# Altium PCB Linux-Capable-Businnes-Card.PcbDoc (part 4 of 4)
Units mil, origin at the board's own origin, x right, y up, seen from the top; angles counter-clockwise.
Board outline 3385.83 x 2125.98 mil, 4 copper layers (L1 (TOP), L2 (GND), L3 (PWR), L4 (BOTTOM)), stack 38.228 mil thick; 154 components, 143 nets, 726 pads, 351 vias.
Unrouted connection lines stored in the file: 1.
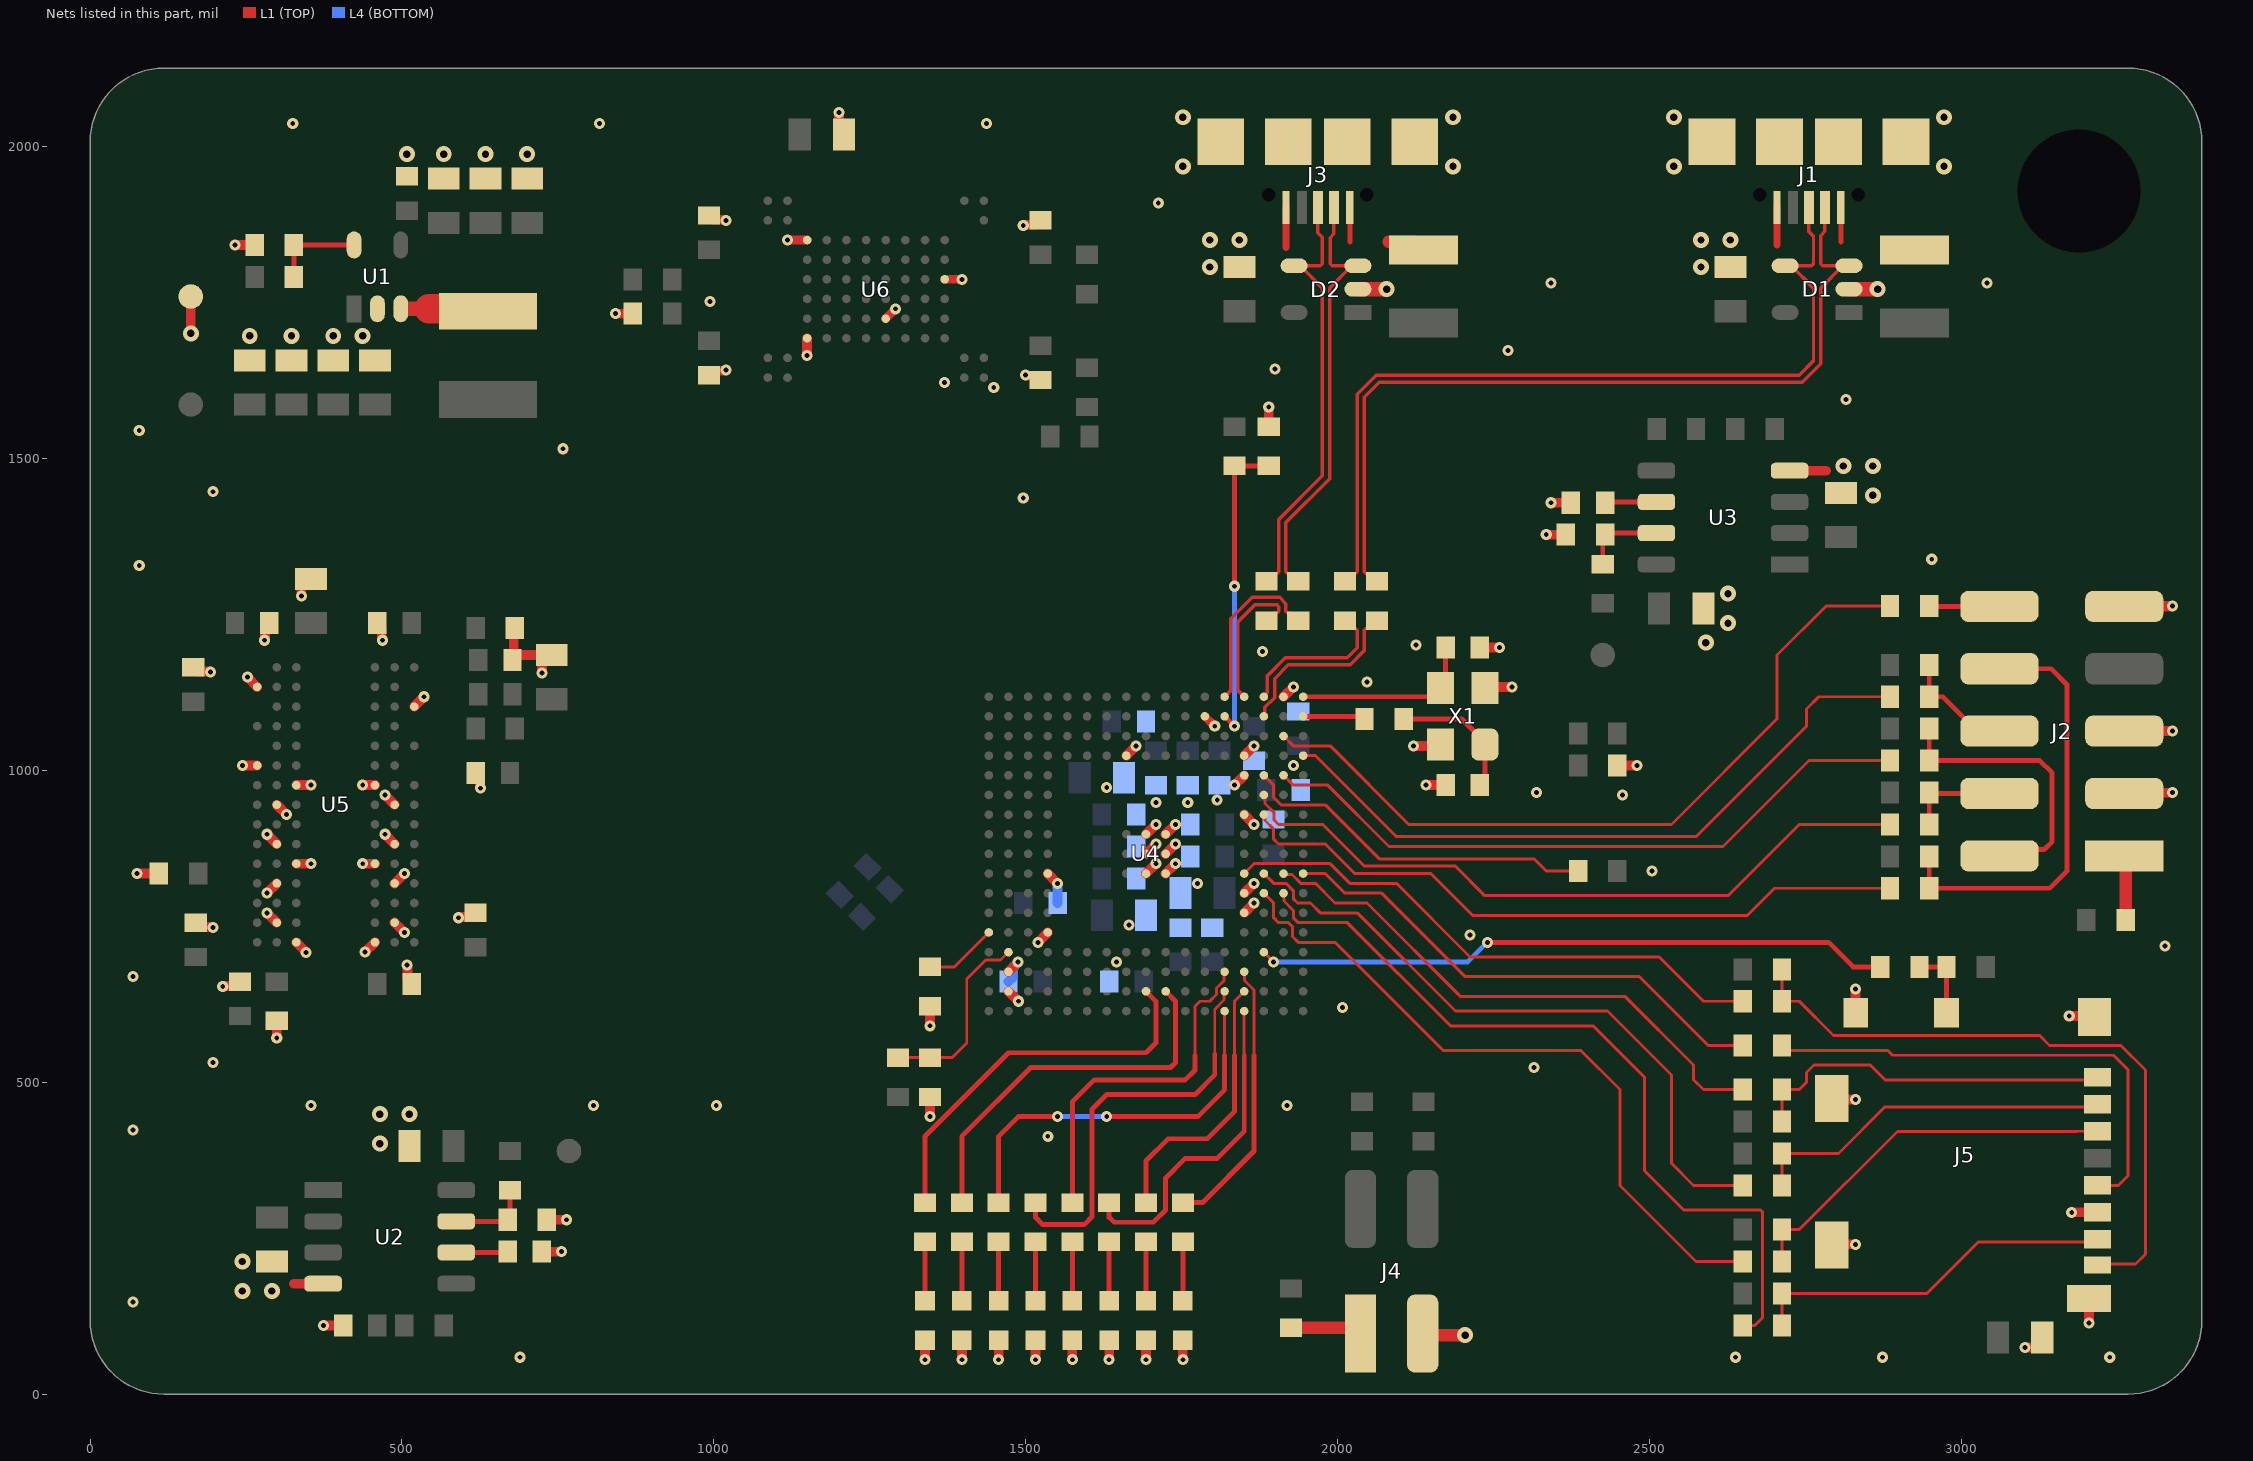
[diagram p6: the nets of this part, all layers, seen from the top]

## Via types
v1: diameter 17.72, hole 7.87, L1 (TOP) to L4 (BOTTOM), tented both sides, 280 vias
v2: diameter 25.59, hole 11.81, L1 (TOP) to L4 (BOTTOM), tented both sides, 71 vias

## Nets (pads, with @x,y where several pads share a name; then routed paths per layer and width w, separated by ;. In a path a pad name is that pad's centre, name@x,y a point inside that pad or via, vN(x,y) a via of type N, cw(c..) or ccw(c..) an arc to the next point about the centre after c; other vN are vias at no path point) (continued)
GND: C1.1 C2.1 C3.1 C4.1 C5.1 C6.1 C7.1 C8.1 C9.1 C10.1 C11.1 C12.1 C13.1 C14.1 C15.1 C16.1 C17.1 C18.1 C19.1 C20.1 C21.1 C22.1 C23.1 C24.1 C25.1 C26.1 C27.1 C28.1 C29.1 C30.1 C31.1 C32.1 C33.1 C34.1 C35.1 C36.1 C37.1 C38.1 C39.1 C40.1 C41.1 C42.1 C43.1 C44.1 C45.1 C46.1 C47.1 C49.1 C50.1 C51.1 C52.1 C53.1 C54.1 C55.1 C56.1 C57.1 C58.1 D1.2 D2.2 D3.1 D4.1 D5.1 D6.1 D7.1 D8.1 D9.1 D10.1 J1.5 J1.SH J2.3 J2.5 J2.9 J3.5 J3.SH J4.3 J5.6 J5.10 J5.MP R4.1 R5.1 R8.1 R11.1 R14.1 R15.1 R18.1 R19.1 R20.1 R24.1 R29.1 TP4.1 U1.2 U2.4 U3.4 U4.B2 U4.B3 U4.D5 U4.D8 U4.H14 U4.J8 U4.J9 U4.J10 U4.K8 U4.K9 U4.K10 U4.M16 U4.P6 U4.P7 U4.P11 U4.P13 U4.P14 U4.T17 U5.A3 U5.A7 U5.B2 U5.B8 U5.D2 U5.D8 U5.E3 U5.E7 U5.F2 U5.F8 U5.H2 U5.H8 U5.J3 U5.J7 U5.K9 U5.N1 U5.P9 U6.C5 U6.F7 U6.K3 U6.K8 X1.2 X1.4 | length 3386.9
  L1 (TOP) w11.81: 1917.32,1838.58 J3.5@1917.32,1902.56 ; 2704.72,1842.52 J1.5@2704.72,1902.56
  L1 (TOP) w13.78: v1(1118.11,1850.39) U6.K3@1149.61,1850.39 ; U6.F7@1275.59,1724.41 v1(1291.34,1740.16) ; U6.C5@1370.08,1787.4 v1(1397.64,1787.4) ; U4.M16@1787.4,1086.61 v1(1803.15,1070.87)
  L1 (TOP) w15.75: v1(74.8,834.65) R19.1@110.24,834.65 ; v2(161.42,1700.79) TP4.1@161.42,1759.84 ; C43.1@165.35,1165.35 172.24,1158.46 191.4,1158.46 192.38,1157.48 v1(192.91,1157.48) ; C40.1@169.29,755.91 176.18,749.02 195.33,749.02 196.32,748.03 v1(196.85,748.03) ; v1(212.6,653.54) 213.13,653.54 214.12,654.53 233.27,654.53 C47.1@240.16,661.42 ; v1(232.28,1842.52) R5.1@263.78,1842.52 ; v1(244.09,1007.87) U5.K9@267.72,1007.87 ; v1(251.97,1149.61) U5.P9@267.72,1133.86 ; v1(279.53,1208.66) 279.53,1209.19 280.51,1210.18 280.51,1229.33 C42.1@287.4,1236.22 ; v1(283.46,771.65) U5.B8@299.21,755.91 ; v1(283.46,803.15) U5.D8@299.21,818.9 ; v1(283.46,897.64) U5.F8@299.21,881.89 ; v1(299.21,570.87) R20.1@299.21,598.43 ; U5.H8@299.21,944.88 v1(314.96,929.13) ; 326.97,176.97 U2.4@373.54,176.97 ; U5.A7@330.71,724.41 330.71,723.87 345.92,708.66 v1(345.92,708.12) ; U5.E7@330.71,850.39 v1(354.33,850.39) ; U5.J7@330.71,976.38 v1(354.33,976.38) ; v1(338.58,1279.53) 338.58,1297.24 348.43,1307.09 C39.1@354.33,1307.09 ; v1(374.02,110.24) C10.1@405.51,110.24 ; v1(437.01,850.39) U5.E3@456.69,850.39 ; v1(437.01,976.38) U5.J3@456.69,976.38 ; v1(440.94,708.66) U5.A3@456.69,724.41 ; C41.1@460.63,1236.22 467.52,1229.33 467.52,1210.18 468.5,1209.19 v1(468.5,1208.66) ; v1(472.44,897.64) U5.F2@488.19,881.89 ; v1(472.44,960.63) U5.H2@488.19,944.88 ; U5.B2@488.19,755.91 v1(503.94,740.16) ; U5.D2@488.19,818.9 v1(503.94,834.65) ; v1(507.87,687.99) 507.87,687.46 508.86,686.48 508.86,664.37 C45.1@515.75,657.48 ; U5.N1@519.69,1102.36 v1(535.43,1118.11) ; v1(590.55,763.78) 591.08,763.78 592.07,764.76 611.22,764.76 C44.1@618.11,771.65 ; C46.1@618.11,996.06 625,989.17 625,972.97 625.98,971.99 v1(625.98,971.46) ; C50.1@677.17,1177.17 677.17,1178.15 C50.1@679.13,1180.12 ; R24.1@681.1,1228.35 679.13,1226.38 C50.1@679.13,1180.12 ; C12.1@724.41,228.35 v1(755.91,228.35) ; v1(724.41,1156.5) C49.1@724.41,1177.17 ; R4.1@732.28,279.53 v1(763.78,279.53) ; C49.1@740.16,1185.04 684.06,1185.04 C50.1@679.13,1180.12 ; v1(842.52,1732.28) R29.1@870.08,1732.28 ; C52.1@992.13,1633.86 999.02,1640.75 1018.17,1640.75 1019.15,1641.73 v1(1019.69,1641.73) ; C53.1@992.13,1889.76 999.02,1882.87 1018.17,1882.87 1019.15,1881.89 v1(1019.69,1881.89) ; v1(1149.61,1665.35) U6.K8@1149.61,1692.91 ; v1(1200.79,2055.12) 1200.79,2037.4 1198.82,2035.43 1208.66,2025.59 C51.1@1208.66,2019.69 ; v1(1338.57,55.12) D3.1@1338.57,86.61 ; v1(1346.46,444.88) R11.1@1346.46,476.38 ; v1(1346.46,590.55) R15.1@1346.46,622.05 ; v1(1397.64,55.12) D4.1@1397.64,86.61 ; v1(1456.69,55.12) D5.1@1456.69,86.61 ; U4.B2@1472.44,645.67 v1(1488.19,629.92) ; U4.B3@1472.44,677.17 1487.72,692.44 v1(1487.72,692.56) ; v1(1496.06,1874.02) 1496.6,1874.02 1497.58,1875 1516.73,1875 C54.1@1523.62,1881.89 ; v1(1499.41,1633.86) 1499.94,1633.86 1500.93,1632.87 1516.73,1632.87 C55.1@1523.62,1625.98 ; v1(1515.75,55.12) D6.1@1515.75,86.61 ; v1(1519.68,724.41) U4.D5@1535.43,740.16 ; U4.D8@1535.43,834.65 v1(1551.18,818.9) ; v1(1574.8,55.12) D7.1@1574.8,86.61 ; v1(1633.86,55.12) D8.1@1633.86,86.61 ; U4.H14@1661.42,1023.62 v1(1677.17,1039.37) ; v1(1692.91,55.12) D9.1@1692.91,86.61 ; U4.J8@1692.91,834.65 v1(1708.66,850.39) ; U4.J9@1692.91,866.14 v1(1708.66,881.89) ; U4.J10@1692.91,897.64 v1(1708.66,913.39) ; U4.K8@1724.41,834.65 v1(1740.16,850.39) ; U4.K9@1724.41,866.14 v1(1740.16,881.89) ; U4.K10@1724.41,897.64 v1(1740.16,913.39) ; v1(1751.97,55.12) D10.1@1751.97,86.61 ; v1(1834.65,976.38) U4.P13@1850.39,992.13 ; U4.P6@1850.39,771.65 v1(1866.14,787.4) ; U4.P7@1850.39,803.15 v1(1866.14,818.9) ; U4.P11@1850.39,929.13 v1(1866.14,913.39) ; U4.P14@1850.39,1023.62 v1(1866.14,1039.37) ; R18.1@1889.76,1551.18 v1(1889.76,1582.68) ; U4.T17@1913.39,1118.11 v1(1929.13,1133.86) ; v1(2122.05,1039.37) 2163.39,1039.37 X1.4@2165.35,1041.34 ; v1(2141.73,976.38) C37.1@2173.23,976.38 ; C38.1@2228.35,1196.85 v1(2259.84,1196.85) ; X1.2@2236.22,1131.89 2238.19,1133.86 v1(2279.53,1133.86) ; v1(2334.65,1377.95) R8.1@2366.14,1377.95 ; v1(2342.52,1429.13) C15.1@2374.02,1429.13 ; R14.1@2448.82,1007.87 v1(2480.31,1007.87) ; U3.4@2724.88,1480.51 2783.46,1480.51 ; J5.MP@2792.32,238.98 2793.5,240.16 v1(2830.71,240.16) ; J5.MP@2792.32,474.02 2793.9,472.44 v1(2830.71,472.44) ; J5.10@2830.71,611.81 v1(2830.71,649.61) ; v1(3102.36,74.8) 3120.08,74.8 3129.92,84.65 C58.1@3129.92,90.55 ; v1(3173.23,606.3) 3212.2,606.3 J5.MP@3213.58,604.92 ; v1(3177.17,291.34) 3177.26,291.44 3218.41,291.44 J5.6@3218.5,291.54 ; v1(3204.72,114.17) J5.MP@3204.72,159.25 ; J2.3@3261.42,962.99 3262.62,964.19 3338.21,964.19 v1(3338.58,964.57) ; J2.5@3261.42,1062.99 v1(3338.58,1062.99) ; v1(3338.58,1263.78) v1@3338.21,1263.4 ; v1@3338.21,1263.4 3337.8,1262.99 J2.9@3261.42,1262.99 3261.83,1263.4 v1@3338.21,1263.4
  L1 (TOP) w19.68: J4.3@2133.86,94.49 v2(2204.72,94.49)
  L1 (TOP) w23.62: D2.2@2032.68,1771.65 v2(2078.74,1771.65) ; D1.2@2820.08,1771.65 v2(2866.14,1771.65)
  L4 (BOTTOM) w15.75: C34.1@1472.44,661.42 1479.33,668.31 1479.33,683.64 1487.72,692.03 v1(1487.72,692.56) ; C17.1@1551.18,787.4 v1(1551.18,818.9)
  other v1: 688.98,59.06 2637.8,59.06 2874.02,59.06 3238.19,59.06 68.9,147.64 1535.43,413.39 68.9,423.23 354.33,462.6 807.09,462.6 1003.94,462.6 1919.29,462.6 2314.96,523.62 196.85,531.5 2007.87,620.08 68.9,669.29 1645.67,692.91 3326.77,718.5 2212.6,736.22 1665.35,751.97 1775.59,818.9 2503.94,838.58 1708.66,948.82 1759.84,948.82 1807.09,952.76 2456.69,960.63 2318.9,964.57 1629.92,972.44 1929.13,1007.87 2047.24,1141.73 1879.92,1190.94 2125.98,1200.79 78.74,1328.74 2952.76,1338.58 1496.06,1437.01 196.85,1446.85 757.87,1515.75 78.74,1545.28 2814.96,1594.49 1448.82,1614.17 1370.08,1622.05 1899.61,1643.7 2273.62,1673.23 994.09,1751.97 2342.52,1781.5 3041.34,1781.5 1712.6,1909.45 324.8,2037.4 816.93,2037.4 1437.01,2037.4
  other v2: 244.09,165.35 291.34,165.35 244.09,212.6 464.57,401.57 464.57,448.82 511.81,448.82 2590.55,1204.72 2625.98,1236.22 2625.98,1283.46 2858.27,1440.94 2811.02,1488.19 2858.27,1488.19 255.91,1696.85 322.83,1696.85 389.76,1696.85 437.01,1696.85 1795.28,1807.09 2582.68,1807.09 1795.28,1850.39 1842.52,1850.39 2582.68,1850.39 2629.92,1850.39 1751.97,1968.5 2185.04,1968.5 2539.37,1968.5 2972.44,1968.5 507.87,1988.19 566.93,1988.19 633.86,1988.19 700.79,1988.19 1751.97,2047.24 2185.04,2047.24 2539.37,2047.24 2972.44,2047.24
JTAG_J_RSTn: J2.10 R41.1 | length 112.9
  L1 (TOP) w4.72: R41.1@2948.82,1263.78 R41.1@2949.6,1262.99
  L1 (TOP) w7.87: R41.1@2949.6,1262.99 J2.10@3061.42,1262.99
JTAG_J_TCK: J2.4 R33.1 R38.1 | length 164.4
  L1 (TOP) w7.87: R38.1@2948.82,913.39 R33.1@2948.82,964.57 2950.39,962.99 J2.4@3061.42,962.99
JTAG_J_TDI: J2.8 R35.1 R40.1 | length 700.6
  L1 (TOP) w7.87: R35.1@2948.82,862.2 R40.1@2948.82,811.02 3141.73,811.02 3169.29,838.58 3169.29,1137.8 3144.09,1162.99 J2.8@3061.42,1162.99
JTAG_J_TDO: J2.6 R34.1 R39.1 | length 186.6
  L1 (TOP) w7.87: R34.1@2948.82,1169.29 R39.1@2948.82,1118.11 2970.67,1118.11 3025.78,1062.99 J2.6@3061.42,1062.99
JTAG_J_TMS: J2.2 R32.1 R37.1 | length 460.1
  L1 (TOP) w7.87: R32.1@2948.82,1066.93 R37.1@2948.82,1015.75 3125.98,1015.75 3145.67,996.06 3145.67,885.83 3132.98,873.13 3071.56,873.13 J2.2@3061.42,862.99
JTAG_TCK: R38.2 U4.R12 | length 1131.9
  L1 (TOP) w4.72: U4.R12@1881.89,960.63 1883.62,958.9 1883.62,947 1898.43,932.19 1898.43,920.47 1905.51,913.39 1976.38,913.39 2043.31,846.46 2188.98,846.46 2236.22,799.21 2625.98,799.21 2740.16,913.39 R38.2@2885.83,913.39
JTAG_TDI: R40.2 U4.R11 | length 1102.6
  L1 (TOP) w4.72: U4.R11@1881.89,929.13 1883.62,927.4 1883.62,919.53 1897.64,905.51 1897.64,889.76 1905.51,881.89 1980.31,881.89 2027.56,834.65 2149.61,834.65 2216.54,767.72 2657.48,767.72 2700.79,811.02 R40.2@2885.83,811.02
JTAG_TDO: R39.2 U4.U14 | length 1103.9
  L1 (TOP) w4.72: U4.U14@1944.88,1023.62 1964.57,1023.62 2094.49,893.7 2574.8,893.7 2751.97,1070.87 2751.97,1098.43 2771.65,1118.11 R39.2@2885.83,1118.11
JTAG_TMS: R37.2 U4.T13 | length 1076.8
  L1 (TOP) w4.72: U4.T13@1913.39,992.13 1929.13,976.38 1984.25,976.38 2082.68,877.95 2618.11,877.95 2755.91,1015.75 R37.2@2885.83,1015.75
JTAGSEL: R10.1 R11.2 U4.B4 | length 307.2
  L1 (TOP) w4.72: R10.1@1295.28,539.37 1381.89,539.37 1405.51,562.99 1405.51,665.35 1436.02,695.87 1459.65,695.87 U4.B4@1472.44,708.66
LED_0: R60.2 U4.J2 | length 627.5
  L1 (TOP) w7.87: R60.2@1338.58,307.09 1338.58,413.38 1472.44,547.24 1692.91,547.24 1708.66,562.99 1708.66,629.92 U4.J2@1692.91,645.67
LED_1: R61.2 U4.K2 | length 618.4
  L1 (TOP) w7.87: R61.2@1397.64,307.09 1397.64,413.39 1507.87,523.62 1732.28,523.62 1740.16,531.5 1740.16,629.92 U4.K2@1724.41,645.67
LED_2: R62.2 U4.N1 | length 625.5
  L1 (TOP) w4.72: 1818.9,543.31 U4.N1@1818.9,614.17
  L1 (TOP) w7.87: R62.2@1456.69,307.09 1456.69,413.39 1488.19,444.88 v1(1551.18,444.88) ; v1(1629.92,444.88) 1775.59,444.88 1818.9,488.19 1818.9,543.31
  L4 (BOTTOM) w7.87: v1(1551.18,444.88) v1(1629.92,444.88)
LED_3: R63.2 U4.N2 | length 656.9
  L1 (TOP) w4.72: 1803.15,545.28 1803.15,616.7 1818.15,631.69 1818.15,644.92 U4.N2@1818.9,645.67
  L1 (TOP) w7.87: R63.2@1515.75,307.09 1515.75,283.46 1527.56,271.65 1593.81,271.65 1606.3,284.14 1606.3,456.69 1629.92,480.32 1771.65,480.32 1803.15,511.81 1803.15,545.28
LED_4: R64.2 U4.N3 | length 565.7
  L1 (TOP) w4.72: 1771.65,543.31 1771.65,622.05 1779.53,629.92 1795.28,629.92 1806.1,640.75 1806.1,650.97 1818.32,663.19 1818.32,676.59 U4.N3@1818.9,677.17
  L1 (TOP) w7.87: R64.2@1574.8,307.09 1574.8,468.5 1610.24,503.94 1755.91,503.94 1771.65,519.69 1771.65,543.31
LED_5: R65.2 U4.P1 | length 526.7
  L1 (TOP) w4.72: 1850.39,543.31 U4.P1@1850.39,614.17
  L1 (TOP) w7.87: R65.2@1633.86,307.09 1633.86,283.46 1641.73,275.59 1704.72,275.59 1724.41,295.28 1724.41,346.46 1755.91,377.95 1807.09,377.95 1850.39,421.26 1850.39,543.31
LED_6: R66.2 U4.P2 | length 440.7
  L1 (TOP) w4.72: 1834.65,543.31 1834.65,629.92 U4.P2@1850.39,645.67
  L1 (TOP) w7.87: R66.2@1692.91,307.09 1692.91,374.02 1728.35,409.45 1791.34,409.45 1834.65,452.76 1834.65,543.31
LED_7: R67.2 U4.P3 | length 442.3
  L1 (TOP) w4.72: U4.P3@1850.39,677.17 1850.97,676.59 1850.97,663.19 1866.14,648.02 1866.14,543.31
  L1 (TOP) w7.87: R67.2@1751.97,307.09 1783.46,307.09 1866.14,389.76 1866.14,543.31
NetC12_2: C12.2 U2.6 | length 82.8
  L1 (TOP) w7.87: U2.6@587.09,226.97 667.91,226.97 C12.2@669.29,228.35
NetC15_2: C15.2 U3.6 | length 82.8
  L1 (TOP) w7.87: C15.2@2429.13,1429.13 2430.51,1430.51 U3.6@2511.34,1430.51
NetC37_2: C37.2 R16.1 X1.1 | length 217.6
  L1 (TOP) w7.87: R16.1@2106.3,1082.68 2198.82,1082.68 2236.22,1045.28 X1.1@2236.22,1041.34 2236.22,984.25 C37.2@2228.35,976.38
NetD3_2: D3.2 R60.1 | length 94.5
  L1 (TOP) w7.87: D3.2@1338.57,149.61 R60.1@1338.58,244.09
NetD4_2: D4.2 R61.1 | length 94.5
  L1 (TOP) w7.87: D4.2@1397.64,149.61 R61.1@1397.64,244.09
NetD5_2: D5.2 R62.1 | length 94.5
  L1 (TOP) w7.87: D5.2@1456.69,149.61 R62.1@1456.69,244.09
NetD6_2: D6.2 R63.1 | length 94.5
  L1 (TOP) w7.87: D6.2@1515.75,149.61 R63.1@1515.75,244.09
NetD7_2: D7.2 R64.1 | length 94.5
  L1 (TOP) w7.87: D7.2@1574.8,149.61 R64.1@1574.8,244.09
NetD8_2: D8.2 R65.1 | length 94.5
  L1 (TOP) w7.87: D8.2@1633.86,149.61 R65.1@1633.86,244.09
NetD9_2: D9.2 R66.1 | length 94.5
  L1 (TOP) w7.87: D9.2@1692.91,149.61 R66.1@1692.91,244.09
NetD10_2: D10.2 R67.1 | length 94.5
  L1 (TOP) w7.87: D10.2@1751.97,149.61 R67.1@1751.97,244.09
NetF1_1: F1.1 J1.1 | length 55.1
  L1 (TOP) w7.87: 2807.09,1847.44 J1.1@2807.09,1902.56
NetF2_1: F2.1 J3.1 | length 116.7
  L1 (TOP) w7.87: 2019.69,1847.49 J3.1@2019.69,1902.56
  L1 (TOP) w19.68: 2081.69,1847.44 2124.41,1847.44 F2.1@2137.8,1834.06
NetJ2_1: J2.1 R31.1 | length 108.1
  L1 (TOP) w19.68: J2.1@3261.42,862.99 3263.78,860.64 R31.1@3263.78,759.84 R31.1@3263.78,755.91
NetJ4_1: J4.1 R44.1 | length 115.3
  L1 (TOP) w19.68: R44.1@1925.2,106.3 2027.17,106.3 J4.1@2036.61,96.85
NetL1_1: L1.1 U1.3 | length 135.8
  L1 (TOP) w23.62: U1.3@498.03,1740.16 543.31,1740.16
  L1 (TOP) w47.24: 543.31,1740.16 L1.1@633.86,1740.16
NetR1_1: R1.1 R4.2 U2.7 | length 132.1
  L1 (TOP) w7.87: U2.7@587.09,276.97 666.73,276.97 R4.2@669.29,279.53 673.23,283.46 R1.1@673.23,326.77
NetR3_2: R3.2 R5.2 U1.5 | length 147.6
  L1 (TOP) w7.87: R3.2@326.77,1791.34 R5.2@326.77,1842.52 U1.5@423.23,1842.52
NetR6_1: R6.1 R8.2 U3.7 | length 132.1
  L1 (TOP) w7.87: R6.1@2425.2,1330.71 2425.2,1374.02 2431.69,1380.51 U3.7@2511.34,1380.51
NRST: R12.2 U4.R13 | length 579.1
  L1 (TOP) w4.72: U4.R13@1881.89,992.13 1897.64,976.38 1897.64,956.69 1909.45,944.88 1980.32,944.88 2066.93,858.27 2314.96,858.27 2334.65,838.58 R12.2@2385.83,838.58
NTRST: R41.2 U4.T15 | length 1236.2
  L1 (TOP) w4.72: U4.T15@1913.39,1055.12 1929.13,1039.37 1988.19,1039.37 2114.17,913.39 2535.43,913.39 2704.72,1082.68 2704.72,1185.04 2783.46,1263.78 R41.2@2885.83,1263.78
SD_CD: R59.2 U4.R4 | length 1024.1
  L1 (TOP) w4.72: U4.R4@1881.89,708.66 v1(1897.64,692.91)
  L1 (TOP) w7.87: v1(2240.16,724.41) 2787.4,724.41 2826.77,685.04 R59.2@2870.08,685.04
  L4 (BOTTOM) w7.87: v1(1897.64,692.91) 2208.66,692.91 v1(2240.16,724.41)
SD_CLK: R56.2 U4.U8 | length 818.9
  L1 (TOP) w4.72: U4.U8@1944.88,834.65 1980.32,834.65 2011.81,803.15 2070.98,803.15 2204.84,669.29 2484.25,669.29 2594.49,559.06 R56.2@2649.61,559.06
SD_CMD: R55.2 U4.R7 | length 1125.3
  L1 (TOP) w4.72: U4.R7@1881.89,803.15 1897.64,787.4 1897.64,763.78 1905.51,755.91 1921.26,755.91 1927.85,749.32 1927.85,733.57 1937.01,724.41 1996.06,724.41 2169.29,551.18 2389.76,551.18 2452.76,488.19 2452.76,334.65 2574.8,212.6 R55.2@2649.61,212.6
SD_DAT0: R57.2 U4.T7 | length 1287.6
  L1 (TOP) w4.72: U4.T7@1913.39,803.15 1913.96,802.57 1913.96,790.76 1929.13,775.59 1929.13,763.78 1937.01,755.91 2015.75,755.91 2181.1,590.55 2409.45,590.55 2492.13,507.87 2492.13,358.27 2555.12,295.28 2678.33,295.28 2681.1,292.51 2681.1,122.05 2669.29,110.24 R57.2@2649.6,110.24
SD_DAT1: R58.2 U4.P8 | length 897.1
  L1 (TOP) w4.72: U4.P8@1850.39,834.65 1866.14,850.39 1988.19,850.39 2019.69,818.9 2094.49,818.9 2212.6,700.79 2515.75,700.79 2586.61,629.92 R58.2@2649.61,629.92
SD_DAT2: R53.2 U4.T8 | length 893.6
  L1 (TOP) w4.72: U4.T8@1913.39,834.65 1915.12,832.91 1927.02,832.91 1941.03,818.9 1964.57,818.9 1996.06,787.4 2047.24,787.4 2196.85,637.8 2460.63,637.8 2570.87,527.56 2570.87,503.94 2586.61,488.19 R53.2@2649.61,488.19
SD_DAT3: R54.2 U4.R8 | length 1065.4
  L1 (TOP) w4.72: U4.R8@1881.89,834.65 1897.64,818.9 1917.32,818.9 1929.13,807.09 1929.13,794.11 1935.84,787.4 1956.69,787.4 1972.44,771.65 2031.5,771.65 2188.98,614.17 2433.07,614.17 2535.43,511.81 2535.43,370.08 2570.86,334.65 R54.2@2649.6,334.65
SD_R_CD: J5.9 R52.1 R59.1 | length 116.5
  L1 (TOP) w7.87: R59.1@2933.07,685.04 R52.1@2976.38,685.04 J5.9@2976.38,611.81
SD_R_CLK: J5.5 R56.1 | length 796.5
  L1 (TOP) w4.72: R56.1@2712.6,559.06 2720.47,551.18 2881.89,551.18 2889.76,543.31 3244.09,543.31 3267.72,519.69 3267.72,350.39 3251.97,334.65 3218.7,334.65 J5.5@3218.5,334.84
SD_R_CMD: J5.3 R49.1 R55.1 | length 622.4
  L1 (TOP) w4.72: R55.1@2712.6,212.6 R49.1@2712.6,263.78 2740.16,263.78 2897.64,421.26 3185.04,421.26 3185.24,421.46 J5.3@3218.5,421.46
SD_R_DAT0: J5.7 R50.1 R57.1 | length 593
  L1 (TOP) w4.72: R57.1@2712.6,110.24 R50.1@2712.6,161.42 2944.88,161.42 3027.56,244.09 3214.37,244.09 J5.7@3218.5,248.23
SD_R_DAT1: J5.8 R51.1 R58.1 | length 1058.8
  L1 (TOP) w4.72: R51.1@2712.6,681.1 R58.1@2712.6,629.92 2740.16,629.92 2795.28,574.8 3125.98,574.8 3141.73,559.06 3255.91,559.06 3295.28,519.69 3295.28,224.41 3279.53,208.66 3220.28,208.66 J5.8@3218.5,206.89
SD_R_DAT2: J5.1 R47.1 R53.1 | length 594.1
  L1 (TOP) w4.72: R47.1@2712.6,437.01 R53.1@2712.6,488.19 2740.16,488.19 2751.97,500 2751.97,515.75 2763.78,527.56 2854.33,527.56 2877.95,503.94 3214.37,503.94 J5.1@3218.5,508.07
SD_R_DAT3: J5.2 R48.1 R54.1 | length 589.8
  L1 (TOP) w4.72: R54.1@2712.6,334.65 R48.1@2712.6,385.83 2803.15,385.83 2877.95,460.63 3214.37,460.63 J5.2@3218.5,464.76
USB_D_N: D1.3 J1.2 R30.1 | length 1361.7
  L1 (TOP) w5.55: R30.1@2062.99,1303.15 2051,1315.14 2046.42,1315.14 2043.17,1318.39 2043.17,1598.29 2066.93,1622.05 2744.94,1622.05 2774.67,1651.78 2774.67,1773.48 2810.24,1809.06 2777.92,1809.06 2774.67,1812.31 2774.67,1857.34 2781.5,1864.17 J1.2@2781.5,1902.56
USB_D_P: D1.4 J1.3 R36.1 | length 1371.7
  L1 (TOP) w5.55: R36.1@2011.81,1303.15 2023.8,1315.14 2028.38,1315.14 2031.63,1318.39 2031.63,1603.07 2062.15,1633.58 2740.16,1633.58 2763.13,1656.56 2763.13,1773.48 D1.4@2727.56,1809.06 ; D1.4@2717.72,1809.06 D1.4@2727.56,1809.06 ; J1.3@2755.91,1902.56 2755.91,1863.92 2763.13,1856.7 2763.13,1812.31 2759.88,1809.06 D1.4@2727.56,1809.06
USB_H_N: D2.3 J3.2 R42.1 | length 694
  L1 (TOP) w5.55: R42.1@1937.01,1303.15 1925.02,1315.14 1920.44,1315.14 1917.18,1318.39 1917.18,1397.5 1987.26,1467.58 1987.26,1773.48 2022.83,1809.06 D2.3@2032.68,1809.06 ; J3.2@1994.09,1902.56 1994.09,1860.24 1988.19,1854.33 1988.19,1812.31 1991.44,1809.06 D2.3@2017.72,1809.06
USB_H_P: D2.4 J3.3 R43.1 | length 700.6
  L1 (TOP) w5.55: R43.1@1885.83,1303.15 1897.81,1315.14 1902.4,1315.14 1905.65,1318.39 1905.65,1402.28 1975.73,1472.36 1975.73,1773.48 D2.4@1940.16,1809.06 ; D2.4@1930.32,1809.06 D2.4@1940.16,1809.06 ; J3.3@1968.5,1902.56 1968.5,1862.2 1975.73,1854.98 1975.73,1812.31 1972.48,1809.06 D2.4@1940.16,1809.06
USBD_N: R30.2 U4.R16 | length 289.2
  L1 (TOP) w5.55: U4.R16@1881.89,1086.61 1883.46,1088.19 1883.46,1101 1899.19,1116.73 1899.19,1147.22 1921.26,1169.29 2020.25,1169.29 2043.17,1192.21 2043.17,1224.92 2046.42,1228.17 2051,1228.17 R30.2@2062.99,1240.16
USBD_P: R36.2 U4.R17 | length 253
  L1 (TOP) w5.55: U4.R17@1881.89,1118.11 1881.89,1119.71 1887.66,1125.48 1887.66,1152 1916.48,1180.83 2015.47,1180.83 2031.63,1196.99 2031.63,1224.92 2028.38,1228.17 2023.8,1228.17 R36.2@2011.81,1240.16
USBH_N: R42.2 U4.N17 | length 274
  L1 (TOP) w5.55: U4.N17@1818.9,1118.11 1828.88,1128.09 1828.88,1243 1863.36,1277.48 1907.18,1277.48 1917.18,1267.47 1917.18,1255.4 1920.44,1252.15 1925.02,1252.15 R42.2@1937.01,1240.16
USBH_P: R43.2 U4.P17 | length 235.7
  L1 (TOP) w5.55: U4.P17@1850.39,1118.11 1840.41,1128.09 1840.41,1238.22 1868.14,1265.95 1902.4,1265.95 1905.65,1262.7 1905.65,1255.4 1902.4,1252.15 1897.81,1252.15 R43.2@1885.83,1240.16
VDDFUSE: R17.1 R18.2 U4.N16 | length 494.7
  L1 (TOP) w7.87: U4.N16@1818.9,1086.61 v1(1834.65,1070.87) ; v1(1834.65,1295.28) R17.1@1834.65,1488.19 R18.2@1889.76,1488.19
  L4 (BOTTOM) w7.87: v1(1834.65,1070.87) v1(1834.65,1295.28)
WKUP: R15.2 U4.A5 | length 117.3
  L1 (TOP) w4.72: R15.2@1346.46,685.04 1385.83,685.04 U4.A5@1440.94,740.16
XIN: C38.2 U4.U17 X1.3 | length 294.4
  L1 (TOP) w7.87: U4.U17@1944.88,1118.11 2151.58,1118.11 X1.3@2165.35,1131.89 2173.23,1139.76 C38.2@2173.23,1196.85
XOUT: R16.2 U4.U16 | length 100.1
  L1 (TOP) w7.87: U4.U16@1944.88,1086.61 2039.37,1086.61 R16.2@2043.31,1082.68
pads on no net: D1.1 D2.1 J1.4 J1.MH1 J1.MH2 J2.7 J3.4 J3.MH1 J3.MH2 U4.A1 U4.A3 U4.A4 U4.A6 U4.B1 U4.B5 U4.B7 U4.B16 U4.C1 U4.C2 U4.C3 U4.C6 U4.C7 U4.C17 U4.D1 U4.D2 U4.D3 U4.D4 U4.D7 U4.D14 U4.D17 U4.E1 U4.E2 U4.E3 U4.E4 U4.E17 U4.F1 U4.F2 U4.F3 U4.F4 U4.F17 U4.G1 U4.G2 U4.G3 U4.G4 U4.G16 U4.G17 U4.H1 U4.H2 U4.H3 U4.H4 U4.H15 U4.H16 U4.H17 U4.J1 U4.J3 U4.J15 U4.K1 U4.K3 U4.K4 U4.L1 U4.L2 U4.M1 U4.M2 U4.M3 U4.M4 U4.N4 U4.N15 U4.P4 U4.P5 U4.R1 U4.R2 U4.R3 U4.R9 U4.R10 U4.T1 U4.T2 U4.T3 U4.T4 U4.T5 U4.T6 U4.T9 U4.T10 U4.T11 U4.T12 U4.T14 U4.U1 U4.U2 U4.U3 U4.U4 U4.U5 U4.U6 U4.U7 U4.U9 U4.U10 U4.U11 U4.U12 U4.U13 U5.A2 U5.E2 U5.R3 U5.R7 U6.A1 U6.A2 U6.A9 U6.A10 U6.B1 U6.B9 U6.B10 U6.D6 U6.D7 U6.D8 U6.E3 U6.E4 U6.E5 U6.E6 U6.E7 U6.E8 U6.F3 U6.F4 U6.F5 U6.F6 U6.F8 U6.G3 U6.G5 U6.G6 U6.G7 U6.G8 U6.H3 U6.H5 U6.H6 U6.H7 U6.J3 U6.J5 U6.L1 U6.L2 U6.L9 U6.L10 U6.M1 U6.M2 U6.M9 U6.M10

## Polygon pours and split planes (outlines as drawn)
GND on L1 (TOP) "USB_GND_TOP4" (solid, remove dead copper, pour order 25): 2716.54,1866.14 2559.06,1866.14 2559.06,1779.53 2716.54,1779.53
GND on L1 (TOP) "USB_GND_TOP3" (solid, remove dead copper, pour order 24): 1929.13,1866.14 1771.65,1866.14 1771.65,1779.53 1929.13,1779.53
GND on L1 (TOP) "USB_GND_TOP2" (solid, remove dead copper, pour order 23): 2503.94,2055.12 2503.94,1952.76 2519.69,1937.01 2984.25,1937.01 3000,1952.76 3000,2055.12 2984.25,2070.87 2519.69,2070.87
GND on L1 (TOP) "USB_GND_TOP1" (solid, remove dead copper, pour order 21): 1716.54,2055.12 1716.54,1952.76 1732.28,1937.01 2196.85,1937.01 2212.6,1952.76 2212.6,2055.12 2196.85,2070.87 1732.28,2070.87
GND on L1 (TOP) "DCDC_GND_TOP" (solid, remove dead copper, pour order 0): 488.19,1921.26 496.06,1913.39 496.06,1629.92 212.6,1629.92 212.6,1732.28 433.07,1732.28 433.07,2023.62 771.65,2023.62 771.65,1921.26
GND on L1 (TOP) "LDO1V0_GND_TOP" (solid, remove dead copper, pour order 29): 220.47,244.09 338.58,244.09 338.58,149.61 220.47,149.61
GND on L1 (TOP) "LDO1V8_GND_TOP" (solid, remove dead copper, pour order 28): 440.94,464.57 535.43,464.57 535.43,362.2 440.94,362.2
GND on L1 (TOP) "LDO1V0_GND_TOP1" (solid, remove dead copper, pour order 27): 2763.78,1409.45 2874.02,1409.45 2874.02,1503.94 2763.78,1503.94
GND on L1 (TOP) "LDO1V0_GND_TOP" (solid, remove dead copper, pour order 26): 2566.93,1188.98 2645.67,1188.98 2645.67,1307.09 2566.93,1307.09
DRAM_VREF on L1 (TOP) "DRAM_VREF" (solid, remove dead copper, pour order 14): 590.55,1251.97 637.8,1251.97 637.8,1039.37 590.55,1039.37 590.55,1059.06
+1V8 on L1 (TOP) "LDO1V8_1V8_TOP" (solid, remove dead copper, pour order 13): 543.31,307.09 629.92,307.09 629.92,362.2 708.66,362.2 708.66,464.57 543.31,464.57
+3V3 on L1 (TOP) "LDO1V8_3V3_TOP" (solid, remove dead copper, pour order 12): 433.07,251.97 220.47,251.97 220.47,307.09 267.72,354.33 433.07,354.33
+1V0 on L1 (TOP) "LDO1V0_1V0_TOP" (solid, remove dead copper, pour order 11): 2472.44,1354.33 2559.06,1354.33 2559.06,1188.98 2472.44,1188.98 2472.44,1228.35 2385.83,1228.35 2385.83,1299.21 2472.44,1299.21
+3V3 on L1 (TOP) "LDO1V0_3V3_TOP" (solid, remove dead copper, pour order 10): 2677.17,1401.57 2874.02,1401.57 2874.02,1338.58 2842.52,1307.09 2677.17,1307.09
NetF1_1 on L1 (TOP) "USB_VBUS_TOP2" (solid, remove dead copper, pour order 9): 2795.87,1866.73 2795.87,1835.24 2843.11,1835.24 2858.86,1819.49 2858.86,1803.74 2866.73,1795.87 3000.59,1795.87 3000.59,1866.73
+5V_VBUS on L1 (TOP) "USB_5V_TOP4" (solid, remove dead copper, pour order 8): 2850.98,1756.5 3000.59,1756.5 3000.59,1654.13 2850.98,1654.13
+5V_VBUS on L1 (TOP) "USB_5V_TOP3" (solid, remove dead copper, pour order 7): 2559.65,1756.5 2748.62,1756.5 2748.62,1677.76 2599.02,1677.76 2559.65,1717.13
NetF2_1 on L1 (TOP) "USB_VBUS_TOP1" (solid, remove dead copper, pour order 6): 2007.87,1866.14 2007.87,1834.65 2055.12,1834.65 2070.87,1818.9 2070.87,1803.15 2078.74,1795.28 2212.6,1795.28 2212.6,1866.14
+5V_VBUS on L1 (TOP) "USB_5V_TOP2" (solid, remove dead copper, pour order 5): 2062.99,1755.91 2212.6,1755.91 2212.6,1653.54 2062.99,1653.54
+5V_VBUS on L1 (TOP) "USB_5V_TOP1" (solid, remove dead copper, pour order 4): 1771.65,1755.91 1960.63,1755.91 1960.63,1677.17 1811.02,1677.17 1771.65,1716.54
+5V_VBUS on L1 (TOP) "DCDC_5V_TOP" (solid, remove dead copper, pour order 3): 771.65,1913.39 771.65,1811.02 488.19,1811.02 486.97,1812.24 488.19,1913.39
+3V3 on L1 (TOP) "DCDC_3V3_TOP" (solid, remove dead copper, pour order 2): 212.6,1622.05 724.41,1622.05 724.41,1527.56 212.6,1527.56
GND on L1 (TOP) "DCDC_GND_TOP" (solid, remove dead copper, pour order 1): 771.65,1842.52
GND on L4 (BOTTOM) "GND_BOTTOM" (solid, remove dead copper, pour order 32): 118.11,2086.61 3267.72,2086.61 cw(c3267.72,2007.87) 3346.46,2007.87 3346.46,118.11 cw(c3267.72,118.11) 3267.72,39.37 118.11,39.37 cw(c118.11,118.11) 39.37,118.11 39.37,2007.87 cw(c118.11,2007.87)
+1V0 on L4 (BOTTOM) "CPU_1V0_BOTTOM" (solid, remove dead copper, pour order 19): 1622.05,1102.36 1622.05,1015.75 1566.93,1015.75 1566.93,862.2 1527.56,862.2 1527.56,834.65 1488.19,834.65 1488.19,755.91 1488.19,692.91 1661.42,692.91 1661.42,637.8 1716.54,637.8 1716.54,724.41 1590.55,724.41 1590.55,960.63 1622.05,960.63 1637.8,960.63 1637.8,1015.75 1661.42,1015.75 1661.42,1102.36
+3V3 on L4 (BOTTOM) "CPU_3V3_BOTTOM1" (solid, remove dead copper, pour order 17): 1881.89,1051.18 1881.89,992.13 1866.14,992.13 1866.14,960.63 1822.83,960.63 1822.83,937.01 1795.28,937.01 1795.28,803.15 1779.53,787.4 1779.53,771.65 1850.39,771.65 1850.39,937.01 1921.26,937.01 1921.26,1015.75 1968.5,1015.75 1968.5,1051.18
+3V3 on L4 (BOTTOM) "CPU_3V3_BOTTOM3" (solid, remove dead copper, pour order 30): 1685.04,1051.18 1685.04,996.06 1791.34,996.06 1811.02,1015.75 1826.77,1015.75 1826.77,1036.22 1808.07,1051.18
+1V0 on L4 (BOTTOM) "CPU_1V0_BOTTOM1" (solid, remove dead copper, pour order 31): 1846.46,1055.12 1913.39,1055.12 1913.39,1090.55 1846.46,1090.55
+1V0 on L4 (BOTTOM) "CPU_1V0_BOTTOM1" (solid, remove dead copper, pour order 20): 1858.27,893.7 1921.26,893.7 1921.26,842.52 1858.27,842.52
+3V3 on L4 (BOTTOM) "CPU_3V3_BOTTOM2" (solid, remove dead copper, pour order 18): 1724.41,724.41 1826.77,724.41 1826.77,637.8 1724.41,637.8
+1V8 on L4 (BOTTOM) "CPU_1V8_BOTTOM" (solid, remove dead copper, pour order 16): 1598.43,952.76 1598.43,732.28 1653.54,732.28 1653.54,952.76
+5V_VBUS on L3 (PWR) "+5V_VBUS" (solid, remove dead copper, pour order 33): 511.81,2086.61 456.69,2031.5 456.69,1826.77 488.19,1795.28 755.91,1795.28 787.4,1826.77 787.4,1960.63 814.96,1988.19 1137.66,1988.19 1188.98,1988.19 1633.86,1988.19 1732.28,1889.76 1732.28,1692.91 1787.4,1637.8 2992.13,1637.8 3033.03,1678.7 3031.5,1680.24 3031.5,2086.61
+3V3 on L3 (PWR) "+3V3" (solid, remove dead copper, pour order 36): 39.37,2007.87 cw(c118.11,2007.87) 118.11,2086.61 3267.72,2086.61 cw(c3267.72,2007.87) 3346.46,2007.87 3346.46,118.11 cw(c3267.72,118.11) 3267.72,39.37 118.11,39.37 cw(c118.11,118.11) 39.37,118.11
+1V8 on L3 (PWR) "+1V8" (solid, remove dead copper, pour order 34): 314.96,1496.06 1338.58,1496.06 1653.54,1181.1 1653.54,1078.74 1590.55,1015.75 1590.55,992.13 1661.42,921.26 1661.42,771.65 1622.05,771.65 1590.55,803.15 1535.43,803.15 1535.43,834.65 1496.06,834.65 1496.06,771.65 1511.81,771.65 1511.81,716.54 1507.87,716.54 1492.13,700.79 1401.57,700.79 1173.23,472.44 858.27,472.44 779.53,393.7 338.58,393.7 70.87,661.42 70.87,1251.97
+1V0 on L3 (PWR) "+1V0" (solid, remove dead copper, pour order 35): 2346.46,1322.83 2582.68,1322.83 2614.17,1291.34 2614.17,1196.85 2598.43,1181.1 2425.2,1181.1 2409.45,1165.35 2409.45,905.51 2354.33,850.39 1866.14,850.39 1846.38,870.16 1846.38,885.75 1842.37,889.76 1818.9,889.76 1732.28,803.15 1732.28,692.91 1716.54,677.17 1598.43,677.17 1574.8,700.79 1574.8,763.78 1566.93,771.65 1503.94,771.65 1503.94,826.77 1507.87,830.71 1531.5,830.71 1535.43,826.77 1535.43,799.21 1582.68,799.21 1618.11,763.78 1669.29,763.78 1669.29,925.2 1602.36,992.13 1602.36,1019.68 1633.86,1019.69 1633.86,1051.18 1677.17,1051.18 1677.17,1000 1700.79,976.38 1755.91,976.38 1799.21,933.07 1838.58,933.07 1862.2,956.69 1929.13,956.69 1952.76,980.31 1952.76,1027.56 1925.2,1055.12 1893.7,1055.12 1882.12,1066.7 1882.12,1075.03 1893.7,1086.61 1937.01,1086.61 1984.25,1039.37 1984.25,980.31 2007.87,956.69 2311.02,956.69 2326.77,972.44 2326.77,1303.15
GND on L2 (GND) "GND" (solid, remove dead copper, pour order 37): 118.11,2106.3 3267.72,2106.3 cw(c3267.72,2007.88) 3366.14,2007.87 3366.14,118.11 cw(c3267.72,118.11) 3267.72,19.68 118.11,19.68 cw(c118.11,118.11) 19.69,118.11 19.69,2007.87 cw(c118.11,2007.87)

## Other copper
L4 (BOTTOM):
  pour cut-out: 314.96,1496.06 1338.58,1496.06 1653.54,1181.1 1653.54,1110.24 1618.11,1110.24 1618.11,1019.69 1562.99,1019.69 1562.99,866.14 1523.62,866.14 1523.62,838.58 1476.38,838.58 1476.38,708.66 1409.45,708.66 1188.98,488.19 299.21,488.19 78.74,708.66 78.74,1259.84

## Silkscreen, mask and mechanical layers (free items; w line width, h text height)
Top Overlay:
  lines w7.87: 744.09,1027.56 755.91,1027.56 744.09,1015.75 744.09,1027.56 ; 744.09,1027.56 783.46,988.19 ; 783.46,988.19 783.46,988.19 ; 783.46,988.19 893.7,988.19 893.7,937.01 956.69,937.01 956.69,826.77 893.7,826.77 893.7,700.79 783.46,700.79 783.46,988.19 ; 1240.16,271.65 1271.65,303.15 1295.28,303.15 ; 1240.16,271.65 1240.16,271.65 ; 1240.16,271.65 858.27,271.65 858.27,62.99 1240.16,62.99 1240.16,271.65 ; 1295.28,303.15 1287.4,295.28 1287.4,311.02 1295.28,303.15 ; 586.61,960.63 586.61,1263.78 712.6,1263.78 712.6,1220.47 783.46,1220.47 783.46,1078.74 712.6,1078.74 712.6,960.63 586.61,960.63 ; 818.9,1590.55 929.13,1590.55 929.13,1692.91 960.63,1692.91 960.63,1818.9 818.9,1818.9 818.9,1708.66 818.9,1590.55 ; 1165.35,488.19 1165.35,590.55 1381.89,590.55 1381.89,433.07 1259.84,433.07 1259.84,488.19 1165.35,488.19 ; 1303.15,55.12 1787.4,55.12 1787.4,338.58 1303.15,338.58 1303.15,55.12 ; 1799.21,1456.69 1799.21,1606.3 2031.5,1606.3 2031.5,1503.94 1925.2,1503.94 1925.2,1456.69 1799.21,1456.69 ; 2244.09,70.87 2244.09,314.96 2354.33,314.96 2354.33,70.87 2244.09,70.87 ; 2354.33,972.44 2492.13,972.44 2492.13,1019.69 2586.61,1019.69 2586.61,1118.11 2354.33,1118.11 2354.33,972.44 ; 3015.75,1330.71 3015.75,1582.68 3299.21,1582.68 3299.21,1330.71 3015.75,1330.71
  text "GND" at 31.5,1748.03 h31.5
  text "USB HOST" at 2263.78,1712.6 h39.37 r90
  text "USB DEVICE" at 2437.01,1681.1 h39.37 r90
  text "CONNECT TO PC" at 2492.13,1669.29 h31.5 r90
  text "JTAG" at 3086.61,1598.43 h31.5
  text "FLASH WP" at 803.15,1582.68 h31.5 r90
  text "3V3" at 31.5,1574.8 h31.5
  text "RST" at 3031.5,1535.43 h31.5
  text "GND" at 3196.85,1535.43 h31.5
  text "128MB NAND FLASH" at 874.02,1507.87 h39.37
  text "TDI" at 3031.5,1488.19 h31.5
  text "NC" at 3196.85,1488.19 h31.5
  text "VDDFUSE" at 1937.01,1460.63 h31.5
  text "TDO" at 3031.5,1440.94 h31.5
  text "GND" at 3196.85,1440.94 h31.5
  text "TCK" at 3031.5,1393.7 h31.5
  text "GND" at 3196.85,1393.7 h31.5
  text "TMS" at 3031.5,1346.46 h31.5
  text "3V3" at 3196.85,1346.46 h31.5
  text "Linux Capable Business Card" at 326.77,1342.52 h118.11
  text "RevA - 2021" at 866.14,1283.46 h59.06
  text "1V0" at 2299.21,1165.35 h31.5
  text "BMS" at 2503.94,976.38 h31.5
  text "256MB DDR2-533" at 204.72,511.81 h39.37
  text "SAM9N12" at 1555.12,496.06 h39.37
  text "JTAGSEL" at 1035.43,440.94 h31.5
  text "1V8" at 811.02,370.08 h31.5
  text "UART / 115200" at 2236.22,338.58 h31.5
  text "TX" at 2291.34,244.09 h31.5 r90
  text "RX" at 2338.58,244.09 h31.5 r90
  text "JLCJLCJLCJLC" at 3066.93,177.17 h35.43 r90
  text "3V3" at 2291.34,86.61 h31.5 r90
  text "GND" at 2338.58,86.61 h31.5 r90
Bottom Overlay:
  drawing of 370 lines, arcs and shapes, not listed
Bottom Solder:
  text "Linux Capable Business Card" at 3011.05,1886.99 h275.59
  text "designed by" at 2062.5,1722.75 h157.48
  text "Manuel Tosone" at 2564.95,1498.55 h275.59
  text "ts.manuel.dev@gmail.com" at 2426.88,304.99 h157.48
  text "Rev A - 2021" at 2419.99,158.87 h118.11
Manufacturing Notes:
  drawing of 283 lines, arcs and shapes, not listed
  text ".ProjectTitle" at -149.61,6174.52 h157.48
  text ".ProjectRevision" at 1409.45,5937.01 h157.48
  text "Board info" at 3937.01,5807.09 h60
  text "Files" at -196.85,5708.66 h60
  text "Minimum Track: 90um(TOP/BOTTOM) 127um(INTERNAL)" at 3937.01,5708.66 h60
  text "*.GTO - Top Overlay" at -196.85,5610.24 h60
  text "Minimum Gap: 90um(TOP/BOTTOM) 127um(INTERNAL)" at 3937.01,5610.24 h60
  text "*.GTP - Top Paste" at -196.85,5511.81 h60
  text "Minimum Through Hole VIA: 0.45mm (pad) / 0.2mm (drill). Drilling: L1-L4" at 3937.01,5511.81 h60
  text "*.GTS - Top Solder" at -196.85,5413.39 h60
  text "*.GTL - L1 (TOP)" at -196.85,5314.96 h60
  text "*.G1  - L2 (GND)" at -196.85,5216.54 h60
  text "1. THIS BOARD CONTAINS IMPEDANCE CONTROLLED TRACKS, TRACK AND GAP SIZES ARE AS FOLLOWS:" at 3937.01,5216.54 h60
  text "*.G2  - L3 (PWR)" at -196.85,5118.11 h60
  text "*.GBL - L4 (BOTTOM)" at -196.85,5019.68 h60
  text "TYPE;" at 4133.86,5019.69 h60
  text "Impedance;" at 4625.98,5019.69 h60
  text "Layer (Reference);" at 5511.81,5019.69 h60
  text "Width (um);" at 6889.76,5019.69 h60
  text "Gap (um);" at 7677.17,5019.69 h60
  text "*.GBS - Bottom Solder" at -196.85,4921.26 h60
  text "*.GBP - Bottom Paste" at -196.85,4822.83 h60
  text "SE;" at 4133.86,4822.83 h60
  text "55ohm;" at 4625.98,4822.83 h60
  text "L1(L2), L4(L3);" at 5511.81,4822.83 h60
  text "120" at 6889.76,4822.83 h60
  text "*.GBO - Bottom Overlay" at -196.85,4724.41 h60
  text "*.GM3 - Manufacturing Notes" at -196.85,4625.98 h60
  text "DIFF;" at 4133.86,4625.98 h60
  text "90ohm;" at 4625.98,4625.98 h60
  text "L1(L2), L4(L3);" at 5511.81,4625.98 h60
  text "141" at 6889.76,4625.98 h60
  text "152" at 7677.17,4625.98 h60
  text "*.GM4 - Mechanical Drawing" at -196.85,4527.56 h60
  text "*.GM5 - Board Outline" at -196.85,4429.13 h60
  text "DIFF;" at 4133.86,4429.13 h60
  text "100ohm;" at 4625.98,4429.13 h60
  text "L1(L2), L4(L3);" at 5511.81,4429.13 h60
  text "110" at 6889.76,4429.13 h60
  text "152" at 7677.17,4429.13 h60
  text "Layer" at -168.26,4170.01 h45.92
  text "Name" at 150.13,4170.01 h45.92
  text "Thickness" at 866.35,4170.01 h45.92
  text "Constant" at 1368.35,4170.01 h45.92
  text "Board Layer Stack" at 1809.15,4170.01 h45.92
  text "Top Overlay" at 150.13,4078.17 h45.92
  text "2. FINISHED PANEL THICKNESS IS NOT CRITICAL: TO BE APPROXIMATELY 1mm" at 3937.01,4035.43 h60
  text "Top Solder" at 150.13,3986.34 h45.92
  text "0.020mm" at 866.35,3986.34 h45.92
  text "3.8" at 1368.35,3986.34 h45.92
  text "1" at -72.63,3894.5 h45.92
  text "L1 (TOP)" at 150.13,3894.5 h45.92
  text "0.035mm" at 866.35,3894.5 h45.92
  text "Dielectric 2" at 150.13,3802.67 h45.92
  text "0.100mm" at 866.35,3802.67 h45.92
  text "4.05" at 1368.35,3802.67 h45.92
  text "3. BOARD FINISH: IMMERSION Au/ELECTROLESS Ni; 0.05-0.12 um GOLD; 3-6um NICKEL" at 3937.01,3740.16 h60
  text "2" at -80.28,3710.83 h45.92
  text "L2 (GND)" at 150.13,3710.83 h45.92
  text "0.018mm" at 866.35,3710.83 h45.92
  text "Dielectric 1" at 150.13,3619 h45.92
  text "0.665mm" at 866.35,3619 h45.92
  text "4.5" at 1368.35,3619 h45.92
  text "3" at -80.28,3527.17 h45.92
  text "L3 (PWR)" at 150.13,3527.17 h45.92
  text "0.018mm" at 866.35,3527.17 h45.92
  text "4. SOLDER RESIST: APPLY TO BOTH SIDES COLOUR - GREEN" at 3937.01,3444.88 h60
  text "Dielectric 3" at 150.13,3435.33 h45.92
  text "0.100mm" at 866.35,3435.33 h45.92
  text "4.05" at 1368.35,3435.33 h45.92
  text "4" at -80.28,3343.5 h45.92
  text "L4 (BOTTOM)" at 150.13,3343.5 h45.92
  text "0.035mm" at 866.35,3343.5 h45.92
  text "Bottom Solder" at 150.13,3251.66 h45.92
  text "0.020mm" at 866.35,3251.66 h45.92
  text "3.8" at 1368.35,3251.66 h45.92
  text "Bottom Overlay" at 150.13,3159.83 h45.92
  text "5. COMPONENT IDENT: COLOUR TO BE WHITE" at 3937.01,3149.61 h60
  text "Total board thickness:" at -168.26,3068 h45.92
  text "1.011mm" at 866.35,3068 h45.92
Mechanical Drawing:
  circle w19.68: c3188.98,1929.13 r98.43
  lines w7.87: 3149.61,1929.13 3228.35,1929.13 ; 3188.98,1889.76 3188.98,1968.5
  lines w19.68: 0,118.11 ccw(c118.11,118.11) 118.11,0 3267.72,0 ccw(c3267.72,118.11) 3385.83,118.11 3385.83,2007.87 ccw(c3267.72,2007.87) 3267.72,2125.98 118.11,2125.98 ccw(c118.11,2007.87) 0,2007.87 0,118.11
  text ".ProjectTitle" at -444.88,2631.22 h157.48
  text ".ProjectRevision" at 1114.17,2393.7 h157.48
Board Outline:
  the board outline again, w19.68
Top Assembly:
  text ".ProjectTitle" at -444.88,2631.22 h157.48
  text ".ProjectRevision" at 1114.17,2393.7 h157.48
Bottom Assembly:
  text ".ProjectTitle" at 3708.66,2643.03 h157.48
  text ".ProjectRevision" at 1838.58,2393.7 h157.48

## Dimensions
0,118.11 to 3385.83,118.11 on Mechanical Drawing
118.11,2125.98 to 118.11,0 on Mechanical Drawing
3188.98,1929.13 to 3267.72,2007.87 on Mechanical Drawing
118.11,2007.87 to -236.22,2283.46 on Mechanical Drawing
3149.61,1929.13 to 3267.72,2125.98 on Mechanical Drawing
3188.98,1889.76 to 3385.83,2007.87 on Mechanical Drawing

## Text inside footprints (layer, text, board x,y; h text height)
J1: Top Assembly "CONNECTOR SIDE" at 2889.76,2102.36 h19.68 r180
J3: Top Assembly "CONNECTOR SIDE" at 2102.36,2102.36 h19.68 r180